# Altium PCB EB1_Spartan_III_1_02.PcbDoc (part 2 of 4)
Units mm, origin at the board's own origin, x right, y up, seen from the top; angles counter-clockwise.
Board outline 165.1 x 115.01 mm, 6 copper layers (Top Layer, MidLayer1, VCC Plane, GND Plane, MidLayer2, Bottom Layer); 356 components, 386 nets, 1788 pads, 779 vias.
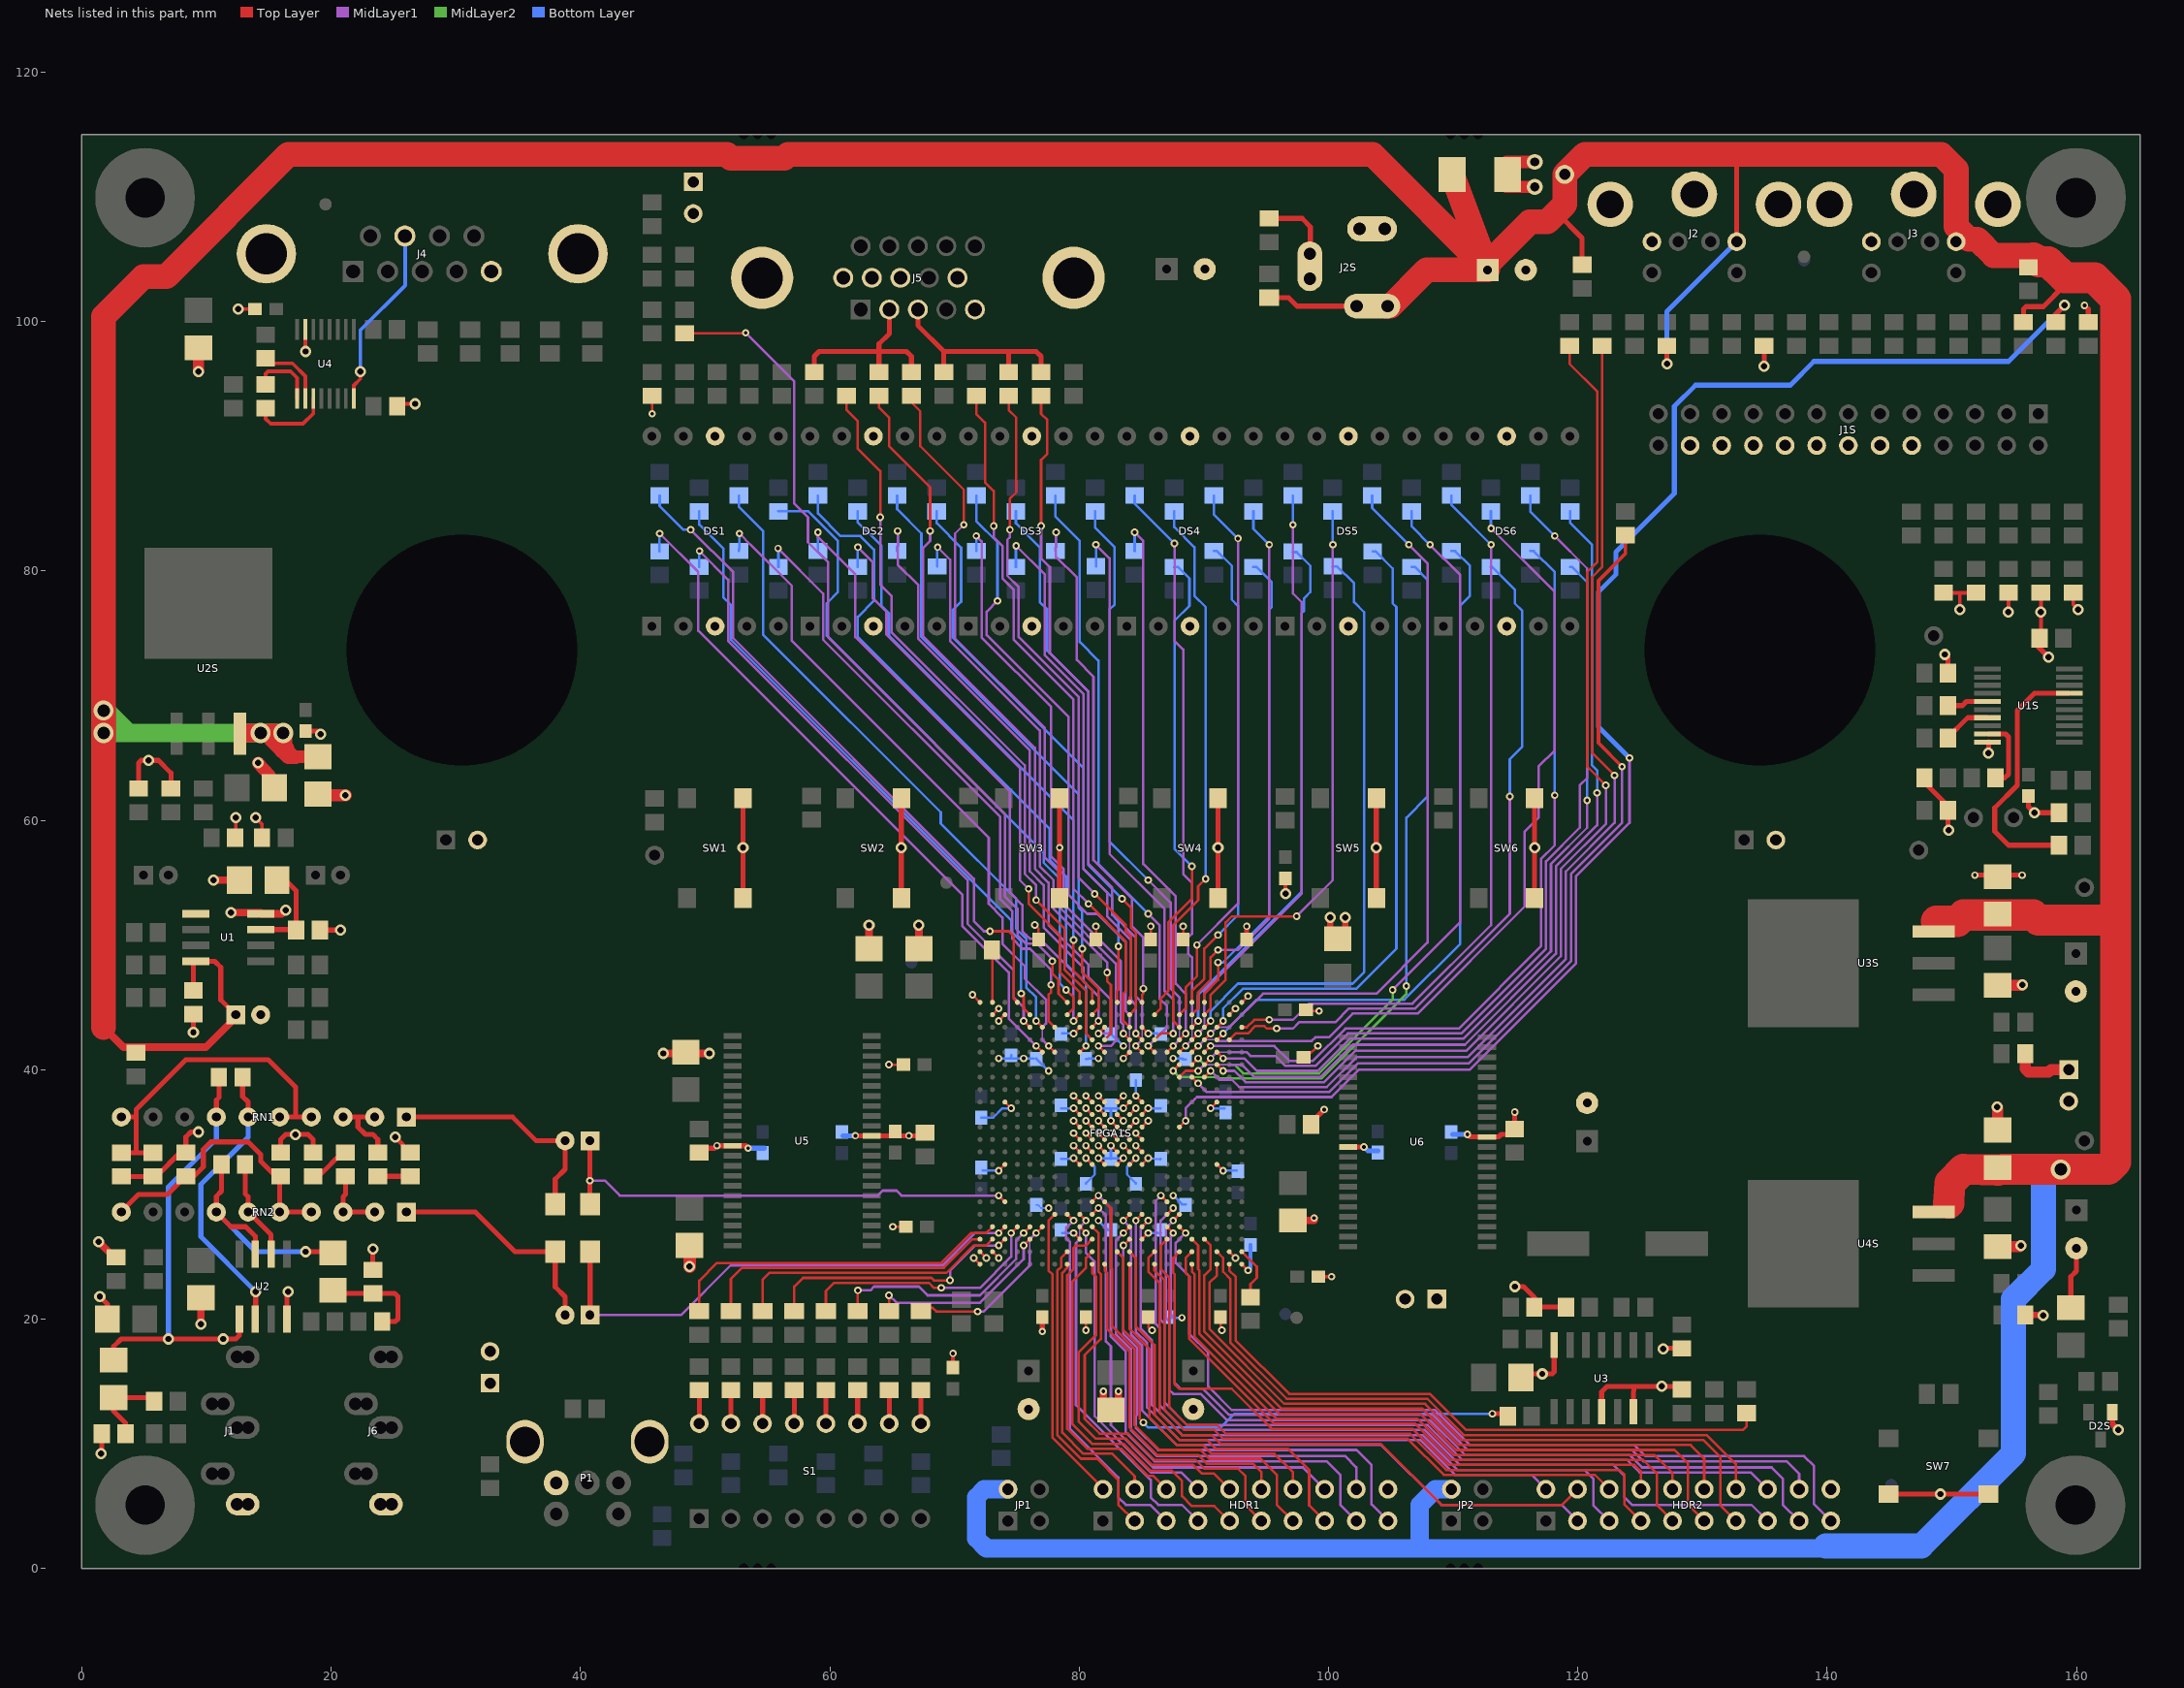
[diagram p6: the nets of this part, all layers, seen from the top]

## Via types
v1: diameter 0.6, hole 0.3, Top Layer to Bottom Layer, tented both sides, 427 vias
v2: diameter 1.6, hole 1, Top Layer to Bottom Layer, 224 vias
v3: diameter 0.9, hole 0.5, Top Layer to Bottom Layer, tented both sides, 126 vias
v4: diameter 1.27, hole 0.711, Top Layer to Bottom Layer, tented both sides, 2 vias

## Nets (pads, with @x,y where several pads share a name; then routed paths per layer and width w, separated by ;. In a path a pad name is that pad's centre, name@x,y a point inside that pad or via, vN(x,y) a via of type N, cw(c..) or ccw(c..) an arc to the next point about the centre after c; other vN are vias at no path point) (continued)
+5V: C37.1 C39.2 C70S.1 C73S.1 C75S.1 C77S.1 D1S.2 J2.5 J2S.1 J2S.1A J2S.1B J3.5 JP1.2 JP2.2 LED1.1 R6.2 R84.1 R85.1 R86.1 R87.1 TP6S.1 U1.8 U2S.3 U3S.3 U4S.3 | length 580.3
  Top Layer w0.4: C39.2@8.95,46.35 U1.8@8.95,48.6 ; U1.8@9.15,48.695 10.655,48.695 11.15,48.2 11.15,45.6 C37.1@12.35,44.4 ; LED1.1@95.25,101.92 96.8,101.92 97.485,101.235 J2S.1A@102.255,101.235 ; J2S.1@102.2,101.3 102.255,101.3 J2S.1@103.45,101.3 ; J2S.1@103.505,101.235 J2S.1@104.55,101.235 ; 118.25,108.8 118.3,108.75 120.35,106.7 R86.1@120.35,104.55 ; 122.55,113.4 122.555,113.595 125.65,113.4 ; v3(127.15,96.6) R87.1@127.15,98.05 ; 132.65,113.3 132.75,113.2 J2.5@132.75,106.4 ; R84.1@155.75,99.95 155.75,101 155.95,101.2 157.35,101.2 158.95,102.8
  Top Layer w0.6: 1.75,43.8 1.75,43.4 3.35,41.8 R6.2@4.35,41.8 ; R6.2@4.35,41.35 R6.2@4.35,41.8 ; C37.1@12.35,44.4 12.35,44.2 9.95,41.8 R6.2@4.35,41.8
  Top Layer w1: v2@14.75,66.8 15.35,66.2 16.55,65 17.15,65 ; v2@15.7,66.95 16.139,66.901 v2@16.15,66.9 ; 16.15,65.4 16.15,65.5 ; 16.15,65.7 16.15,65.5 ; v2(16.15,67) v2@16.15,66.9 ; 16.55,65.7 16.55,65.8 ; 16.95,65.2 16.15,66 v2@16.15,66.9 ; C73S.1@18.95,65.1 16.55,65.1 16.2,65.45 16.15,65.5
  Top Layer w1.5: U2S.3@12.95,67 v2(14.35,67) v2(16.15,67) 16.15,66.9 16.15,66 16.15,65.7
  Top Layer w2: 1.75,43.4 v2(1.75,67) v2(1.75,68.8) 1.75,100.4 4.95,103.6 6.784,103.6 16.55,113.4 51.75,113.4 52.05,113.1 56.35,113.1 56.65,113.4 103.55,113.4 C70S.1@112.776,104.14 ; J2S.1@104.55,101.235 J2S.1B@104.755,101.235 104.985,101.235 107.89,104.14 C70S.1@112.776,104.14 ; D1S.2@109.928,111.8 C70S.1@112.776,104.14 ; C70S.1@112.776,104.626 116.15,108 117.55,108 118.3,108.75 118.95,109.4 TP6S.1@118.95,111.8 120.55,113.4 122.55,113.4 125.65,113.4 149.15,113.4 150.35,112.2 150.35,107.6 150.95,107 151.35,106.6 152.05,106.6 153.35,105.3 156.15,105.3 156.65,105.3
  Top Layer w2.5: 148.75,51.9 150.45,51.9 150.95,52.4 153.67,52.4 156.55,52.4 156.95,52 163.15,52 ; 149.75,29.3 149.782,29.617 149.85,30.9 150.95,32 153.666,31.953 153.696,31.952 154.07,32 v2(158.75,32) 162.55,32 163.15,32.6 163.15,52 ; 156.551,105.096 156.775,104.975 156.95,104.8 157.75,104.8 159.05,103.5 161.45,103.5 163.15,101.8 163.15,52
  MidLayer2 w1.5: v2(16.15,67) v2(14.35,67) 3.75,67 ; 3.75,67 2.75,68 1.95,68.8 v2(1.75,68.8) v2(1.75,67) 3.75,67
  Bottom Layer w0.4: v3(127.15,96.6) 127.15,100.8 J2.5@132.75,106.4
  Bottom Layer w1.5: JP1.2@74.295,6.35 72.39,6.35 71.755,5.715 71.755,2.395 72.55,1.6 139.69,1.6 139.89,1.8 ; 107.315,1.905 107.315,5.08 108.585,6.35 JP2.2@109.855,6.35
  Bottom Layer w2: 139.89,1.8 147.55,1.8 154.95,9.2 154.95,21.6 157.35,24 157.35,32 ; 156.95,32 157.35,32 ; v2(158.75,32) 157.35,32
AUDIOL: C7.1 C41.1 FPGA1S.W3 | length 41.3
  Top Layer w0.2: v1(73.55,26.9) FPGA1S.W3@74.05,27.4
  Top Layer w0.4: C41.1@40.767,20.32 40.77,20.323 C7.1@40.77,25.4
  MidLayer1 w0.2: C41.1@40.767,20.32 48.07,20.32 52.05,24.3 69.05,24.3 71.65,26.9 v1(73.55,26.9)
AUDIOR: C6.1 C40.1 FPGA1S.U3 | length 39.4
  Top Layer w0.2: v1(73.55,29.9) FPGA1S.U3@74.05,29.4
  Top Layer w0.4: C40.1@40.767,34.29 40.767,31.1 40.767,29.213 C6.1@40.77,29.21
  MidLayer1 w0.2: v1(40.75,31.1) 41.95,31.1 43.15,29.9 63.85,29.9 64.25,30.3 65.35,30.3 65.75,29.9 v1(73.55,29.9)
BLUE0: FPGA1S.C13 R106.1 | length 55.9
  Top Layer w0.2: R106.1@71.75,94.05 71.75,92.6 72.45,91.9 72.45,87.1 73.15,86.4 v1(73.15,83.6) ; v1(80.75,53.3) 83.75,50.3 83.75,46.3 83.55,46.1 83.55,43.9 FPGA1S.C13@84.05,43.4
  MidLayer1 w0.2: v1(73.15,83.6) 73.15,82.7 73.85,82 73.85,79.4 74.75,78.5 74.75,74.5 79.55,69.7 79.55,54.5 v1(80.75,53.3)
BLUE1: FPGA1S.A13 R108.1 | length 53.3
  Top Layer w0.2: R108.1@74.35,94.05 74.35,92.9 74.95,92.3 74.95,86.3 74.45,85.8 v1(74.45,83.3) ; v1(81.25,54.1) 83.75,51.6 83.75,51.1 84.15,50.7 84.15,45.9 84.05,45.8 FPGA1S.A13@84.05,45.4
  MidLayer1 w0.2: v1(74.45,83.3) 74.45,82.7 74.25,82.5 74.25,79.6 75.15,78.7 75.15,74.7 79.95,69.9 79.95,55.4 v1(81.25,54.1)
BLUE2: FPGA1S.E14 R111.1 | length 56.8
  Top Layer w0.2: v1(76.95,83.6) 76.95,88.9 77.45,89.4 77.45,92.1 76.95,92.6 R111.1@76.95,94.05 ; v1(84.55,41.9) FPGA1S.E14@85.05,41.4
  MidLayer1 w0.127: 85.05,42.4 85.05,43.4
  MidLayer1 w0.2: v1(76.95,83.6) 76.95,81 77.65,80.3 77.65,73.4 80.75,70.3 80.75,56.5 82.65,54.6 82.65,52.5 84.55,50.6 84.55,45.9 85.05,45.4 85.05,43.4 ; v1(84.55,41.9) 85.05,42.4
BLUE#: J5.3 R107.2 R108.2 R111.2 | length 16.7
  Top Layer w0.4: J5.3@67.064,100.965 67.064,99.686 69.15,97.6 ; R107.2@69.15,95.95 69.15,97.6 ; R108.2@74.35,95.95 74.35,97.6 ; R111.2@76.95,96 76.95,97.2 76.55,97.6 74.35,97.6 ; 69.15,97.6 74.35,97.6
CTS: J4.7 U4.8 | length 14.8
  Top Layer w0.3: U4.8@21.825,93.825 21.825,94.875 22.35,95.4 v3(22.35,96)
  Bottom Layer w0.3: v3(22.35,96) 22.35,99.3 25.95,102.9 25.95,106.825 J4.7@25.92,106.855
DIG0_SEG0: FPGA1S.C6 R25.2 | length 52.7
  Top Layer w0.2: v1(76.55,43.9) FPGA1S.C6@77.05,43.4
  Bottom Layer w0.2: R25.2@52.705,86.045 52.705,85.145 54.65,83.2 54.65,74.9 68.906,60.644 68.906,59.744 74.95,53.7 74.95,51.3 75.75,50.5 75.75,46.6 76.55,45.8 v1(76.55,43.9)
DIG0_SEG1: FPGA1S.B8 R29.2 | length 52.5
  Top Layer w0.2: v1(78.95,46.4) 79.55,45.8 79.55,44.9 FPGA1S.B8@79.05,44.4
  Bottom Layer w0.2: R29.2@55.88,84.775 58.275,84.775 60.65,82.4 60.65,78.3 59.75,77.4 59.75,74.8 77.15,57.4 77.15,56.6 78.45,55.3 78.45,46.9 v1(78.95,46.4)
DIG0_SEG2: FPGA1S.E7 R33.2 | length 53.8
  Top Layer w0.2: v1(77.55,41.9) FPGA1S.E7@78.05,41.4
  MidLayer1 w0.127: 77.05,42.4 77.05,43.4
  MidLayer1 w0.2: v1(52.75,83) 53.643,82.093 ; 53.65,82.1 56.95,78.8 56.95,74.4 72.75,58.6 72.75,53.3 73.85,52.2 73.85,50.1 75.65,48.3 75.65,47.3 77.35,45.6 77.35,43.7 77.05,43.4 ; 77.05,42.4 v1(77.55,41.9)
  Bottom Layer w0.2: R33.2@52.705,81.595 52.705,81.755 52.75,81.8 v1(52.75,83)
DIG0_SEG3: FPGA1S.C5 R37.2 | length 50.5
  Top Layer w0.2: v1(75.55,43.9) FPGA1S.C5@76.05,43.4
  MidLayer1 w0.2: v1(49.55,81.6) 51.85,79.3 51.85,74.4 71.05,55.2 71.05,51.7 74.75,48 74.75,45.8 75.55,45 v1(75.55,43.9)
  Bottom Layer w0.2: R37.2@49.53,80.325 49.53,81.58 v1(49.55,81.6)
DIG0_SEG4: FPGA1S.E6 R41.2 | length 55.7
  Top Layer w0.2: v1(76.55,41.9) FPGA1S.E6@77.05,41.4
  MidLayer1 w0.2: v1(46.35,83) 49.45,79.9 49.45,75.2 70.65,54 70.65,51.5 74.35,47.8 74.35,44.1 v1(76.55,41.9)
  Bottom Layer w0.2: R41.2@46.35,81.57 v1(46.35,83)
DIG0_SEG5: FPGA1S.B5 R45.2 | length 51.4
  Top Layer w0.2: v1(75.35,46.1) 75.55,45.9 75.55,44.9 FPGA1S.B5@76.05,44.4
  Bottom Layer w0.2: R45.2@49.53,84.775 49.53,83.72 51.45,81.8 51.45,77.9 52.05,77.3 52.05,74.5 74.55,52 74.55,51.1 75.35,50.3 v1(75.35,46.1)
DIG0_SEG6: FPGA1S.A4 R49.2 | length 54.1
  Top Layer w0.2: v1(72.85,51.1) 74.35,51.1 74.75,50.7 74.75,45.7 FPGA1S.A4@75.05,45.4
  MidLayer1 w0.2: v1(48.85,83.3) 52.25,79.9 52.25,74.6 71.55,55.3 71.55,51.9 72.35,51.1 v1(72.85,51.1)
  Bottom Layer w0.2: R49.2@46.355,86.045 46.355,85.195 48.25,83.3 v1(48.85,83.3)
DIG0_SEG7: FPGA1S.C7 R53.2 | length 49.6
  Top Layer w0.2: v1(77.75,46.8) 77.75,46.2 77.55,46 77.55,43.9 FPGA1S.C7@78.05,43.4
  MidLayer1 w0.2: v1(55.85,81.8) 59.475,78.175 59.475,74.475 73.65,60.3 73.65,53.7 74.65,52.7 74.65,50.5 75.45,49.7 76.05,49.7 77.75,48 v1(77.75,46.8)
  Bottom Layer w0.2: v1(55.85,81.8) 55.88,81.77 R53.2@55.88,80.325
DIG1_SEG0: FPGA1S.B10 R26.2 | length 48.5
  Top Layer w0.2: v1(80.25,49.7) 80.25,47.8 81.55,46.5 81.55,44.9 FPGA1S.B10@81.05,44.4
  Bottom Layer w0.2: R26.2@65.405,86.045 65.405,84.945 67.35,83 67.35,74.7 79.95,62.1 79.95,53 80.25,52.7 v1(80.25,49.7)
DIG1_SEG1: FPGA1S.A12 R30.2 | length 46
  Top Layer w0.2: FPGA1S.A12@83.05,45.4 83.05,46.3 83.15,46.4 v1(83.15,49.9)
  Bottom Layer w0.2: R30.2@68.58,84.775 68.58,83.82 70.536,81.864 70.536,77.521 69.85,76.835 69.85,74.7 80.35,64.2 80.35,56.1 82.65,53.8 82.65,52.4 83.15,51.9 v1(83.15,49.9)
DIG1_SEG2: FPGA1S.C10 R34.2 | length 48.3
  Top Layer w0.2: FPGA1S.C10@81.05,43.4 v1(81.55,43.9)
  MidLayer1 w0.2: v1(65.45,83.2) 65.45,80.5 67.101,78.849 67.101,74.549 76.05,65.6 76.05,55.9 77.15,54.8 77.15,51.4 80.35,48.2 80.35,47.1 81.55,45.9 v1(81.55,43.9)
  Bottom Layer w0.2: R34.2@65.405,81.595 65.405,81.955 65.45,82 v1(65.45,83.2)
DIG1_SEG3: FPGA1S.A9 R38.2 | length 45.5
  Top Layer w0.2: v1(75.95,54.5) 75.95,53.3 78.45,50.8 78.45,47.8 80.05,46.2 FPGA1S.A9@80.05,45.4
  MidLayer1 w0.2: v1(62.25,81.9) 63.45,80.7 63.45,77.8 64.55,76.7 64.55,74.9 75.25,64.2 75.25,55.2 v1(75.95,54.5)
  Bottom Layer w0.2: R38.2@62.23,80.325 62.23,80.48 62.25,80.5 v1(62.25,81.9)
DIG1_SEG4: FPGA1S.B9 R42.2 | length 50.4
  Top Layer w0.2: v1(79.55,43.9) FPGA1S.B9@80.05,44.4
  MidLayer1 w0.2: v1(59.05,83.1) 59.05,82.7 62.05,79.7 62.05,74.7 74.45,62.3 74.45,54.2 75.45,53.2 75.45,51.1 75.761,50.789 76.05,50.5 76.85,50.5 79.55,47.8 v1(79.55,43.9)
  Bottom Layer w0.2: v1(59.05,83.1) 59.055,83.095 R42.2@59.055,81.595
DIG1_SEG5: FPGA1S.A10 R46.2 | length 47.2
  Top Layer w0.2: v1(79.55,50.4) 79.55,47.9 81.05,46.4 FPGA1S.A10@81.05,45.4
  Bottom Layer w0.2: R46.2@62.23,84.775 62.23,83.92 64.15,82 64.15,77.2 64.75,76.6 64.75,74.8 79.55,60 v1(79.55,50.4)
DIG1_SEG6: FPGA1S.E9 R50.2 | length 55.8
  Top Layer w0.2: FPGA1S.E9@80.05,41.4 v1(80.55,41.9)
  Bottom Layer w0.2: R50.2@59.055,86.045 59.055,84.595 60.85,82.8 62.45,82.8 63.55,81.7 63.55,77.6 62.25,76.3 62.25,74.7 77.65,59.3 77.65,56.8 78.95,55.5 78.95,48.5 80.55,46.9 v1(80.55,41.9)
DIG1_SEG7: FPGA1S.D11 R54.2 | length 47
  Top Layer w0.2: FPGA1S.D11@82.05,42.4 82.55,42.9 82.55,46.8 82.25,47.1 v1(82.25,47.8)
  MidLayer1 w0.2: v1(68.65,81.9) 69.65,80.9 69.65,74.4 76.85,67.2 76.85,56.3 77.95,55.2 77.95,52.9 82.25,48.6 v1(82.25,47.8)
  Bottom Layer w0.2: R54.2@68.623,80.347 68.623,81.873 v1(68.65,81.9)
DIG2_SEG0: FPGA1S.E15 R27.2 | length 49.2
  Top Layer w0.2: v1(85.55,41.9) FPGA1S.E15@86.05,41.4
  MidLayer1 w0.127: 87.05,43.4 87.05,44.4
  MidLayer1 w0.2: v1(85.55,41.9) 87.05,43.4 ; v1(85.55,52.5) 86.45,51.6 86.45,45.7 87.05,45.1 87.05,44.4
  Bottom Layer w0.2: R27.2@78.105,86.045 78.105,84.345 80.05,82.4 80.05,74.3 81.55,72.8 81.55,56.5 v1(85.55,52.5)
DIG2_SEG1: FPGA1S.E16 R31.2 | length 46.9
  Top Layer w0.2: FPGA1S.E16@87.05,41.4 v1(87.55,41.9)
  MidLayer1 w0.127: 88.05,42.4 88.05,43.4
  MidLayer1 w0.2: v1(85.55,55.2) 87.35,53.4 87.35,46.5 88.05,45.8 88.05,43.4 ; v1(87.55,41.9) 88.05,42.4
  Bottom Layer w0.2: R31.2@81.28,84.775 81.28,83.47 82.85,81.9 82.85,77.3 82.45,76.9 82.45,58.3 v1(85.55,55.2)
DIG2_SEG2: FPGA1S.A14 R35.2 | length 42.2
  Top Layer w0.2: FPGA1S.A14@85.05,45.4 85.05,46 85.15,46.1 v1(85.15,46.5)
  MidLayer1 w0.2: v1(78.15,83.1) 78.15,81.1 79.814,79.466 79.814,72.866 81.15,71.5 81.15,56.8 84.25,53.7 84.25,51.5 85.15,50.6 v1(85.15,46.5)
  Bottom Layer w0.2: R35.2@78.105,81.595 78.105,81.855 78.15,81.9 v1(78.15,83.1)
DIG2_SEG3: FPGA1S.D14 R39.2 | length 45.5
  Top Layer w0.2: v1(84.55,42.9) FPGA1S.D14@85.05,42.4
  MidLayer1 w0.2: v1(74.95,82) 77.25,79.7 77.25,73.234 80.35,70.134 80.35,56.1 82.25,54.2 82.25,52.3 84.15,50.4 84.15,45.6 84.55,45.2 v1(84.55,42.9)
  Bottom Layer w0.2: R39.2@74.93,80.325 74.93,81.98 v1(74.95,82)
DIG2_SEG4: FPGA1S.D13 R43.2 | length 46.7
  Top Layer w0.2: v1(83.55,42.9) FPGA1S.D13@84.05,42.4
  MidLayer1 w0.2: v1(71.75,82.8) 72.187,82.363 72.187,74.651 77.75,69.1 77.75,57.1 78.75,56.1 78.75,53.3 83.35,48.7 83.35,43.8 83.55,43.6 v1(83.55,42.9)
  Bottom Layer w0.2: v1(71.75,82.8) 71.755,82.795 R43.2@71.755,81.595
DIG2_SEG5: FPGA1S.B13 R47.2 | length 44.6
  Top Layer w0.2: v1(83.45,53.7) 84.15,53 84.15,51.4 84.55,51 84.55,44.9 FPGA1S.B13@84.05,44.4
  Bottom Layer w0.2: R47.2@74.93,84.775 74.93,83.82 76.85,81.9 76.85,77.5 77.45,76.9 77.45,73.6 80.75,70.3 80.75,56.4 v1(83.45,53.7)
DIG2_SEG6: FPGA1S.E13 R51.2 | length 52.3
  Top Layer w0.2: v1(83.55,40.9) FPGA1S.E13@84.05,41.4
  MidLayer1 w0.127: 84.05,41.4 84.05,43.4
  MidLayer1 w0.2: v1(73.45,77.6) 72.593,76.733 72.593,74.854 79.15,68.3 79.15,54 80.65,52.5 81.45,52.5 83.75,50.2 83.75,44.7 84.05,44.4 84.05,43.4 ; v1(83.55,40.9) 84.05,41.4
  Bottom Layer w0.2: R51.2@71.755,86.045 71.755,83.995 73.45,82.3 v1(73.45,77.6)
DIG2_SEG7: FPGA1S.D15 R55.2 | length 45.2
  Top Layer w0.2: FPGA1S.D15@86.05,42.4 86.55,42.9 v1(87.55,42.9)
  MidLayer1 w0.2: v1(81.35,82.1) 82.45,81 82.45,57.3 86.85,52.9 86.85,46.3 87.55,45.6 v1(87.55,42.9)
  Bottom Layer w0.2: R55.2@81.35,80.37 v1(81.35,82.1)
DIG3_SEG0: FPGA1S.B17 R28.2 | length 44.4
  Top Layer w0.2: FPGA1S.B17@88.05,44.4 88.55,44.9 88.55,46.6 89.45,47.5 v1(89.45,50)
  MidLayer1 w0.2: v1(89.45,50) 92.75,53.3 v1(92.75,82.6)
  Bottom Layer w0.2: R28.2@90.805,86.045 90.805,84.545 v1(92.75,82.6)
DIG3_SEG1: FPGA1S.B18 R32.2 | length 44.4
  Top Layer w0.2: FPGA1S.B18@89.05,44.4 89.55,44.9 89.55,46.2 90.55,47.2 90.55,49 v1(91.15,49.6)
  MidLayer1 w0.2: v1(91.15,49.6) 92.75,49.6 95.25,52.1 v1(95.25,82.1)
  Bottom Layer w0.2: R32.2@93.98,84.775 93.98,83.37 v1(95.25,82.1)
DIG3_SEG2: FPGA1S.A18 R36.2 | length 38.7
  Top Layer w0.2: FPGA1S.A18@89.05,45.4 89.05,46.3 90.05,47.3 90.05,49.7 v1(91.15,50.8)
  Bottom Layer w0.2: R36.2@90.805,81.595 91.055,81.595 92.25,80.4 92.25,77.7 92.75,77.2 92.75,52.4 v1(91.15,50.8)
DIG3_SEG3: FPGA1S.B15 R40.2 | length 38.9
  Top Layer w0.2: FPGA1S.B15@86.05,44.4 86.55,44.9 86.55,45.7 87.15,46.3 87.15,51.8 89.05,53.7 v1(89.05,56.3)
  Bottom Layer w0.2: R40.2@87.63,80.325 87.925,80.325 88.85,79.4 88.85,77.2 87.65,76 87.65,57.7 v1(89.05,56.3)
DIG3_SEG4: FPGA1S.D17 R44.2 | length 44.1
  Top Layer w0.2: FPGA1S.D17@88.05,42.4 v1(88.55,42.9)
  MidLayer1 w0.2: v1(84.45,83.1) 85.15,82.4 85.15,56.5 87.75,53.9 87.75,46.9 88.55,46.1 v1(88.55,42.9)
  Bottom Layer w0.2: v1(84.45,83.1) 84.455,83.095 R44.2@84.455,81.595
DIG3_SEG5: FPGA1S.C17 R48.2 | length 43.7
  Top Layer w0.2: FPGA1S.C17@88.05,43.4 87.55,43.9 87.55,51.6 89.55,53.6 89.55,54.7 v1(90.15,55.3)
  Bottom Layer w0.2: R48.2@87.63,84.775 87.63,83.52 89.25,81.9 89.25,78 90.15,77.1 v1(90.15,55.3)
DIG3_SEG6: FPGA1S.E17 R52.2 | length 47.2
  Top Layer w0.2: FPGA1S.E17@88.05,41.4 v1(88.55,41.9)
  MidLayer1 w0.127: 89.05,42.4 89.05,44.4
  MidLayer1 w0.2: v1(87.65,82.2) 87.65,74.4 88.35,73.7 88.35,55.7 89.05,55 89.05,50.9 88.75,50.6 88.75,49.3 89.05,49 89.05,44.4 ; v1(88.55,41.9) 89.05,42.4
  Bottom Layer w0.2: R52.2@84.455,86.045 84.455,85.395 v1(87.65,82.2)
DIG3_SEG7: FPGA1S.A19 R56.2 | length 38.1
  Top Layer w0.2: FPGA1S.A19@90.05,45.4 90.05,46.1 91.15,47.2 v1(91.15,48.6)
  Bottom Layer w0.2: v1(91.15,48.6) 91.55,48.6 95.25,52.3 95.25,76.9 95.45,77.1 95.45,79.1 94.225,80.325 R56.2@93.98,80.325
DIG4_SEG0: FPGA1S.D19 R57.2 | length 58.8
  Top Layer w0.2: FPGA1S.D19@90.05,42.4 v1(90.55,42.9)
  MidLayer1 w0.127: 91.05,43.4 92.05,43.4
  MidLayer1 w0.2: v1(90.55,42.9) 91.05,43.4 ; 92.05,43.4 94.75,46.1 103.85,46.1 107.95,50.2 107.95,80.6 v1(106.45,82.1)
  Bottom Layer w0.2: R57.2@103.505,86.045 103.505,85.045 v1(106.45,82.1)
DIG4_SEG1: FPGA1S.F18 R59.2 | length 62.3
  Top Layer w0.2: FPGA1S.F18@89.05,40.4 v1(89.55,40.9)
  MidLayer1 w0.2: v1(105.15,46.4) 110.55,51.8 110.55,79.7 v1(108.15,82.1)
  MidLayer2 w0.127: 90.023,40.427 90.05,40.4 92.05,40.4
  MidLayer2 w0.2: v1(89.55,40.9) 90.05,40.4 ; 92.05,40.4 92.45,40.4 93.15,39.7 99.25,39.7 105.15,45.6 v1(105.15,46.4)
  Bottom Layer w0.2: R59.2@106.68,84.775 106.68,83.57 v1(108.15,82.1)
DIG4_SEG2: FPGA1S.C20 R61.2 | length 50.4
  Top Layer w0.2: FPGA1S.C20@91.05,43.4 v1(91.55,43.9)
  Bottom Layer w0.2: v1(91.55,43.9) 91.55,44.9 93.15,46.5 102.25,46.5 105.45,49.7 105.45,77.1 105.15,77.4 105.15,80.2 103.78,81.57 R61.2@103.55,81.57
DIG4_SEG3: FPGA1S.C19 R63.2 | length 48.9
  Top Layer w0.2: FPGA1S.C19@90.05,43.4 v1(90.55,43.9)
  Bottom Layer w0.2: v1(90.55,43.9) 90.55,44.7 92.75,46.9 101.95,46.9 102.85,47.8 102.85,76.7 102.05,77.5 102.05,79 100.68,80.37 R63.2@100.35,80.37
DIG4_SEG4: FPGA1S.C18 R65.2 | length 42.8
  Top Layer w0.2: FPGA1S.C18@89.05,43.4 v1(89.55,43.9)
  Bottom Layer w0.2: v1(89.55,43.9) 89.55,46 97.85,54.3 97.85,76.6 98.05,76.8 98.05,77.8 98.55,78.3 98.55,80.4 97.45,81.5 R65.2@97.15,81.5
DIG4_SEG5: FPGA1S.B19 R67.2 | length 47.7
  Top Layer w0.2: FPGA1S.B19@90.05,44.4 90.55,44.9 90.55,46 91.75,47.2 91.75,51.8 92.25,52.3 v1(97.45,52.3)
  MidLayer1 w0.2: v1(97.45,52.3) 100.35,55.2 v1(100.35,82.1)
  Bottom Layer w0.2: R67.2@100.33,84.775 100.33,84.22 100.35,84.2 v1(100.35,82.1)
DIG4_SEG6: FPGA1S.D18 R69.2 | length 47.6
  Top Layer w0.2: FPGA1S.D18@89.05,42.4 v1(89.55,42.9)
  MidLayer1 w0.127: 90.05,43.4 90.05,44.4
  MidLayer1 w0.2: v1(89.55,42.9) 90.05,43.4 ; 90.05,44.4 90.05,46.3 97.85,54.1 97.85,77.5 97.15,78.2 v1(97.15,83.7)
  Bottom Layer w0.2: v1(97.15,83.7) 97.15,85.6 97.155,85.605 R69.2@97.155,86.045
DIG4_SEG7: FPGA1S.F17 R71.2 | length 58.1
  Top Layer w0.2: v1(87.55,39.9) FPGA1S.F17@88.05,40.4
  MidLayer2 w0.127: 89.05,39.4 91.15,39.4
  MidLayer2 w0.2: v1(87.55,39.9) 88.05,39.4 89.05,39.4 ; 91.15,39.4 91.25,39.3 99.45,39.3 106.25,46.1 v1(106.25,46.7)
  Bottom Layer w0.2: v1(106.25,46.7) 106.25,60.2 107.95,61.9 107.95,79.3 106.925,80.325 R71.2@106.68,80.325
DIG5_SEG0: FPGA1S.F19 R58.2 | length 71.8
  Top Layer w0.2: FPGA1S.F19@90.05,40.4 v1(90.55,40.9)
  MidLayer1 w0.127: 91.05,41.4 92.05,41.4
  MidLayer1 w0.2: v1(90.55,40.9) 91.05,41.4 ; 92.05,41.4 93.45,41.4 93.75,41.1 95.75,41.1 96.55,40.3 98.95,40.3 101.55,42.9 110.65,42.9 117.45,49.7 117.45,56.7 120.15,59.4 120.15,62.8 120.75,63.4 120.75,80.2 v1(118.15,82.8)
  Bottom Layer w0.2: R58.2@116.205,86.045 116.205,84.745 v1(118.15,82.8)
DIG5_SEG1: FPGA1S.G17 R60.2 | length 72.9
  Top Layer w0.2: FPGA1S.G17@88.05,39.4 88.55,39.9 v1(89.55,39.9)
  MidLayer1 w0.127: 90.05,40.4 92.05,40.4
  MidLayer1 w0.2: v1(89.55,39.9) 90.05,40.4 ; 92.05,40.4 93.05,40.4 94.05,39.4 99.35,39.4 101.95,42 110.95,42 118.25,49.3 118.25,56.3 121.55,59.6 v1(121.55,62.2)
  Bottom Layer w0.2: R60.2@119.38,84.775 119.38,83.87 121.15,82.1 121.15,64.4 121.55,64 v1(121.55,62.2)
DIG5_SEG2: FPGA1S.E19 R62.2 | length 64.6
  Top Layer w0.2: FPGA1S.E19@90.05,41.4 v1(90.55,41.9)
  MidLayer1 w0.2: v1(90.55,41.9) 95.65,41.9 96.85,40.7 98.75,40.7 101.35,43.3 110.45,43.3 117.05,49.9 117.05,56.9 118.15,58 v1(118.15,62)
  Bottom Layer w0.2: R62.2@116.205,81.595 116.455,81.595 118.15,79.9 v1(118.15,62)
DIG5_SEG3: FPGA1S.D21 R64.2 | length 56.2
  Top Layer w0.2: FPGA1S.D21@92.05,42.4 92.55,42.9 93.55,42.9 94.15,43.5 94.85,43.5 95.05,43.3 v1(95.85,43.3)
  MidLayer1 w0.2: v1(95.85,43.3) 97.15,43.3 97.65,43.8 100.55,43.8 101.65,44.9 106.95,44.9 114.55,52.5 v1(114.55,61.9)
  Bottom Layer w0.2: R64.2@113.03,80.325 113.125,80.325 114.95,78.5 114.95,77.4 115.55,76.8 115.55,65.9 114.55,64.9 v1(114.55,61.9)
DIG5_SEG4: FPGA1S.D20 R66.2 | length 55.3
  Top Layer w0.2: FPGA1S.D20@91.05,42.4 v1(91.55,42.9)
  Bottom Layer w0.2: v1(91.55,42.9) 94.25,45.6 106.084,45.6 110.55,50.066 110.55,77.2 111.35,78 111.35,80.4 110.155,81.595 R66.2@109.855,81.595
DIG5_SEG5: FPGA1S.E18 R68.2 | length 66.4
  Top Layer w0.2: FPGA1S.E18@89.05,41.4 v1(89.55,41.9)
  MidLayer1 w0.127: 90.05,42.4 91.05,42.4
  MidLayer1 w0.2: v1(89.55,41.9) 90.05,42.4 ; 91.05,42.4 91.15,42.3 98.65,42.3 98.95,42.6 100.05,42.6 101.95,44.5 107.15,44.5 115.75,53.1 115.75,59.1 116.85,60.2 116.85,64.3 118.15,65.6 118.15,78.3 v1(113.05,83.4)
  Bottom Layer w0.2: R68.2@113.03,84.775 113.03,83.42 v1(113.05,83.4)
DIG5_SEG6: FPGA1S.C22 R70.2 | length 59.2
  Top Layer w0.2: FPGA1S.C22@93.05,43.4 93.45,43.4 94.05,44 v1(95.25,44)
  MidLayer1 w0.2: v1(95.25,44) 97.15,44 98.45,45.3 106.75,45.3 113.05,51.6 v1(113.05,82.1)
  Bottom Layer w0.2: R70.2@109.855,86.045 109.855,85.295 v1(113.05,82.1)
DIG5_SEG7: FPGA1S.E20 R72.2 | length 64.1
  Top Layer w0.2: FPGA1S.E20@91.05,41.4 v1(91.55,40.9)
  MidLayer1 w0.2: v1(91.55,40.9) 93.25,40.9 94.25,39.9 99.15,39.9 101.75,42.5 110.85,42.5 117.85,49.5 117.85,56.5 120.75,59.4 v1(120.75,61.6)
  Bottom Layer w0.2: R72.2@119.38,80.325 119.525,80.325 120.75,79.1 v1(120.75,61.6)
FCLK: FPGA1S.AA12 R122.1 | length 44.4
  Top Layer w0.2: FPGA1S.AA12@83.05,25.4 83.55,24.9 83.55,19.1 84.85,17.8 84.85,12.034 85.15,11.734 v1(85.15,11.7)
  Top Layer w0.4: v1(113.15,12.4) R122.1@114.4,12.4
  Bottom Layer w0.2: v1(85.15,11.7) 85.55,11.3 91.35,11.3 92.45,12.4 v1(113.15,12.4)
FPGA_CCLK: FPGA1S.AA22 R1S.2 | length 4.4
  Top Layer w0.2: FPGA1S.AA22@93.05,25.4 94.25,24.2 94.25,23.3 93.75,22.8 R1S.2@93.75,21.75
FPGA_PROGRAM: FPGA1S.A2 R2S.2 | length 4
  Top Layer w0.2: FPGA1S.A2@73.05,45.4 R2S.2@73.05,49.4
GND: C1S.2 C2S.2 C3.2 C3S.2 C4.2 C4S.2 C5.2 C5S.2 C6S.2 C7S.2 C8S.2 C9.1 C9S.2 C10S.2 C11.1 C11S.2 C12S.2 C13S.2 C14.1 C14S.2 C15.1 C15S.2 C16.1 C16S.2 C17.1 C17S.2 C18.2 C18S.2 C19.2 C19S.2 C20S.2 C21S.2 C22S.2 C23.2 C23S.2 C24.2 C24S.2 C25.1 C25S.2 C26.1 C26S.2 C27.1 C27S.2 C28.1 C28S.2 C29.1 C29S.2 C30.1 C30S.2 C31.2 C31S.2 C32.1 C32S.2 C33S.2 C34.1 C34S.2 C35S.2 C36S.2 C37.2 C37S.2 C38S.2 C39.1 C39S.2 C40S.2 C41S.2 C42S.2 C43S.2 C44S.2 C45S.2 C46S.2 C47S.2 C48S.2 C49S.2 C50S.2 C51S.2 C52S.2 C53S.2 C54S.2 C55S.2 C56S.2 C57S.2 C58S.2 C59S.2 C60S.2 C61S.2 C62S.2 C63S.2 C64S.2 C65S.2 C66S.2 C67S.2 C68S.2 C69S.2 C70S.2 C71S.2 C72S.2 C73S.2 C74S.2 C75S.2 C76S.2 C77S.2 C78S.2 C79S.1 C80S.2 D1S.1 D2S.1 DS1.3 DS1.8 DS2.3 DS2.8 DS3.3 DS3.8 DS4.3 DS4.8 DS5.3 DS5.8 DS6.3 DS6.8 FPGA1S.A1 FPGA1S.A22 FPGA1S.AA1 FPGA1S.AA2 FPGA1S.AA21 FPGA1S.AB1 FPGA1S.AB22 FPGA1S.B2 FPGA1S.B3 FPGA1S.B21 FPGA1S.C9 FPGA1S.C14 FPGA1S.J3 FPGA1S.J9 FPGA1S.J10 FPGA1S.J11 FPGA1S.J12 FPGA1S.J13 FPGA1S.J14 FPGA1S.J20 FPGA1S.K9 FPGA1S.K10 FPGA1S.K11 FPGA1S.K12 FPGA1S.K13 FPGA1S.K14 FPGA1S.L9 FPGA1S.L10 FPGA1S.L11 FPGA1S.L12 FPGA1S.L13 FPGA1S.L14 FPGA1S.M9 FPGA1S.M10 FPGA1S.M11 FPGA1S.M12 FPGA1S.M13 FPGA1S.M14 FPGA1S.N9 FPGA1S.N10 FPGA1S.N11 FPGA1S.N12 FPGA1S.N13 FPGA1S.N14 FPGA1S.P3 FPGA1S.P9 FPGA1S.P10 FPGA1S.P11 FPGA1S.P12 FPGA1S.P13 FPGA1S.P14 FPGA1S.P20 FPGA1S.Y9 FPGA1S.Y14 GJ1S.1 GJ1S.2 GJ2S.1 GJ2S.2 GJ3S.1 GJ3S.2 GJ4S.1 GJ4S.2 HDR1.20 HDR2.20 J1.1 J1.1A J1.1B J1S.18 J1S.19 J1S.20 J1S.21 J1S.22 J1S.23 J1S.24 J1S.25 J2.3 J2.MH1 J2.MH2 J2.MH3 J2S.2 J2S.2A J2S.2B J2S.3 J2S.3A J2S.3B J3.3 J3.MH1 J3.MH2 J3.MH3 J4.5 J4.10 J4.11 J5.5 J5.6 J5.7 J5.8 J5.10 J5.16 J5.17 J6.1 J6.1A J6.1B LS1.2 LS2.2 P1.3 P1.6 P1.7 R4.2 R5.2 R5S.1 R6S.1 R7S.1 R8.2 R8S.1 R31S.1 R34S.1 R35S.1 R36S.1 R74.1 R75.1 R76.1 R77.1 R78.1 R79.1 R80.1 R81.1 R83.1 R120.1 R121.1 S1.9 S1.10 S1.11 S1.12 S1.13 S1.14 S1.15 S1.16 SW1.3 SW1.4 SW2.3 SW2.4 SW3.3 SW3.4 SW4.3 SW4.4 SW5.3 SW5.4 SW6.3 SW6.4 SW7.3 SW7.4 U1.4 U1.5 U1S.10 U2.4 U3.7 U3.11 U3.13 U4.15 U5.12 U5.34 U6.12 U6.34 | length 356.8
  Top Layer w0.2: v1(45.75,92.6) C24.2@45.75,94.05 ; v1(64.75,40.4) C10S.2@65.9,40.4 ; v1@64.85,27.4 v1(65.05,27.4) C35S.2@65.9,27.4 ; v1(71.45,46) FPGA1S.A1@72.05,45.4 ; v1(71.55,24.9) FPGA1S.AB1@72.05,24.4 ; FPGA1S.AA1@72.05,25.4 v1(72.55,24.9) ; FPGA1S.AA2@73.05,25.4 v1(73.55,24.9) ; FPGA1S.B2@73.05,44.4 v1(73.55,44.9) ; v1(73.55,31.9) FPGA1S.P3@74.05,32.4 ; v1(73.55,43.9) FPGA1S.B3@74.05,44.4 ; FPGA1S.J3@74.05,37.4 v1(74.55,36.9) ; v1(76.45,51.6) 76.75,51.3 C40S.2@76.75,50.45 ; v1(79.55,26.9) FPGA1S.Y9@80.05,26.4 ; v1(79.55,32.9) FPGA1S.P9@80.05,32.4 ; v1(79.55,33.9) FPGA1S.N9@80.05,33.4 ; v1(79.55,34.9) FPGA1S.M9@80.05,34.4 ; v1(79.55,35.9) FPGA1S.L9@80.05,35.4 ; v1(79.55,36.9) FPGA1S.K9@80.05,36.4 ; v1(79.55,37.9) FPGA1S.J9@80.05,37.4 ; v1(79.55,42.9) FPGA1S.C9@80.05,43.4 ; v1(80.55,19.1) C7S.2@80.55,20.15 ; v1(80.55,32.9) FPGA1S.P10@81.05,32.4 ; v1(80.55,33.9) FPGA1S.N10@81.05,33.4 ; v1(80.55,34.9) FPGA1S.M10@81.05,34.4 ; v1(80.55,35.9) FPGA1S.L10@81.05,35.4 ; v1(80.55,36.9) FPGA1S.K10@81.05,36.4 ; v1(80.55,37.9) FPGA1S.J10@81.05,37.4 ; C16S.2@81.35,50.45 v1(81.35,51.5) ; v1(81.55,32.9) FPGA1S.P11@82.05,32.4 ; v1(81.55,33.9) FPGA1S.N11@82.05,33.4 ; v1(81.55,34.9) FPGA1S.M11@82.05,34.4 ; v1(81.55,35.9) FPGA1S.L11@82.05,35.4 ; v1(81.55,36.9) FPGA1S.K11@82.05,36.4 ; v1(81.55,37.9) FPGA1S.J11@82.05,37.4 ; v1(82.55,33.9) FPGA1S.N12@83.05,33.4 ; v1(82.55,34.9) FPGA1S.M12@83.05,34.4 ; v1(82.55,35.9) FPGA1S.L12@83.05,35.4 ; FPGA1S.P12@83.05,32.4 v1(83.55,32.9) ; FPGA1S.K12@83.05,36.4 v1(83.55,35.9) ; FPGA1S.J12@83.05,37.4 v1(83.55,37.9) ; v1(83.55,33.9) FPGA1S.N13@84.05,33.4 ; v1(83.55,34.9) FPGA1S.M13@84.05,34.4 ; v1(83.55,36.9) FPGA1S.J13@84.05,37.4 ; FPGA1S.P13@84.05,32.4 v1(84.55,32.9) ; FPGA1S.L13@84.05,35.4 v1(84.55,35.9) ; FPGA1S.K13@84.05,36.4 v1(84.55,36.9) ; v1(84.55,33.9) FPGA1S.N14@85.05,33.4 ; v1(84.55,34.9) FPGA1S.M14@85.05,34.4 ; v1(84.55,37.9) FPGA1S.J14@85.05,37.4 ; FPGA1S.Y14@85.05,26.4 v1(85.55,26.9) ; FPGA1S.P14@85.05,32.4 v1(85.55,32.9) ; FPGA1S.L14@85.05,35.4 v1(85.55,35.9) ; FPGA1S.K14@85.05,36.4 v1(85.55,36.9) ; FPGA1S.C14@85.05,43.4 v1(85.55,42.9) ; C29S.2@85.55,20.15 85.55,19.3 v1(85.85,19.1) ; C24S.2@85.75,50.45 v1(85.75,51.5) ; C39S.2@88.35,50.45 v1(88.35,51.5) ; v1(90.55,36.9) FPGA1S.J20@91.05,37.4 ; FPGA1S.P20@91.05,32.4 v1(91.55,31.9) ; C2S.2@91.35,20.15 91.35,19.1 v1(91.45,19.1) ; FPGA1S.AA21@92.05,25.4 v1(92.55,24.9) ; FPGA1S.B21@92.05,44.4 v1(92.55,44.9) ; FPGA1S.AB22@93.05,24.4 v1(93.55,23.9) ; FPGA1S.A22@93.05,45.4 v1(93.55,45.9) ; C38S.2@98.1,41.1 98.35,41.1 v1(99.15,41.9) ; C1S.2@98.25,44.7 v1(99.25,44.7)
  Top Layer w0.3: R121.1@12.35,58.6 v3(12.35,60.2) ; v3(12.55,101) C26S.2@13.9,101 ; v3(13.95,60.2) 14.45,59.7 R120.1@14.45,58.7 ; U4.15@17.925,99.375 17.925,97.625 v3(17.95,97.6) ; C23.2@25.15,93.4 25.3,93.4 v3(26.75,93.4) ; C13S.2@69.885,16.095 v1(69.885,17.245) ; v3(96.55,54.1) C25S.2@96.55,55.35 C25S.2@96.55,55.4 ; C8S.2@99.15,23.4 C8S.2@99.2,23.4 v1(100.25,23.4) ; C67S.2@149.35,78.25 150.65,78.25 ; v3(150.65,76.9) 150.65,78.25 ; C66S.2@151.95,78.25 150.65,78.25 ; v3(154.55,76.7) C61S.2@154.55,78.25 ; C68S.2@157.15,74.8 v3(157.15,76.7) C64S.2@157.15,78.25 ; C63S.2@159.75,78.25 159.75,77.3 v3(160.15,76.9)
  Top Layer w0.4: v3(1.45,21.8) 2.05,21.2 C4.2@2.05,20 C4.2@2.05,19.9 ; v3(1.55,9.2) 1.6,9.25 R4.2@1.6,10.8 ; C9.1@3.175,31.435 C14.1@5.715,31.435 5.985,31.435 C11.1@7.95,33.4 ; R35S.1@4.55,63.15 4.55,64.6 4.75,64.8 v3(5.35,64.8) 6.15,64.8 7.15,63.8 R36S.1@7.15,63.15 ; C11.1@8.35,33.35 8.35,34.6 8.75,35 v3(9.35,35) ; v3(8.95,43) C39.1@8.95,44.45 ; C15.1@15.95,33.35 15.95,34.4 16.35,34.8 v3(17.15,34.8) 18.15,34.8 18.55,34.4 C17.1@18.55,33.35 ; U2.4@16.455,20 16.455,22.105 v3(16.55,22.2) ; C3S.2@17.95,67.15 18.9,67.15 v3(19.15,66.9) ; C34.1@19.1,51.2 v3(20.75,51.2) ; R5.2@23.35,23.95 v3(23.35,25.6) ; v3(25.15,34.6) C16.1@26.35,33.35 C16.1@26.35,33.2 ; C26.1@49.35,33.7 49.53,33.7 50.75,33.7 v1(50.95,33.9) 50.96,33.89 U5.12@52.21,33.89 53.26,33.89 v1(53.45,33.7) ; S1.16@49.53,11.62 R74.1@49.53,14.29 ; S1.15@52.07,11.62 R75.1@52.07,14.29 ; SW1.3@53.04,53.775 v3(53.04,57.8) SW1.4@53.04,61.785 ; S1.14@54.61,11.62 R76.1@54.61,14.29 ; S1.13@57.15,11.62 R77.1@57.15,14.2 ; S1.12@59.69,11.62 R78.1@59.69,14.29 ; v1(62.05,34.7) 62.06,34.69 U5.34@63.36,34.69 65.25,34.69 65.35,34.69 v1(66.35,34.7) 67.647,34.691 67.648,34.691 C28.1@67.75,34.69 ; S1.11@62.23,11.62 R79.1@62.23,14.29 ; S1.10@64.77,11.62 R80.1@64.77,14.29 ; SW2.3@65.74,53.775 v3(65.74,57.8) SW2.4@65.74,61.785 ; S1.9@67.31,11.62 R81.1@67.31,14.29 ; v1(77.05,19) C36S.2@77.05,20.15 ; SW3.3@78.44,53.775 v1(78.44,57.8) SW3.4@78.44,61.785 ; SW4.3@91.14,53.775 v3(91.14,57.8) SW4.4@91.14,61.785 ; C4S.2@93.45,50.45 v1(93.45,51.5) ; R83.1@95.25,108.265 97.885,108.265 98.55,107.6 98.55,105.435 J2S.3@98.55,105.2 ; C27.1@98.65,35.8 v1(99.65,36.8) ; U6.12@101.575,33.8 v1(102.85,33.8) ; SW5.3@103.84,53.775 v3(103.84,57.8) SW5.4@103.84,61.785 ; v1(111.15,34.8) 111.35,34.6 U6.34@112.725,34.6 113.65,34.6 113.85,34.8 114.935,34.8 C25.1@115.05,34.8 ; v3(114.95,22.6) 115.65,22.6 116.52,21.73 C30.1@116.52,20.955 ; C25.1@114.95,35.2 114.95,35.24 v1(114.95,36.6) ; C56S.2@115.35,15.6 115.45,15.6 v3(117.15,15.6) 117.95,15.6 118.11,15.76 U3.7@118.11,17.915 ; SW6.3@116.54,53.775 v3(116.54,57.8) SW6.4@116.54,61.785 ; C30.1@116.55,20.8 116.55,20.925 C30.1@116.52,20.955 ; C32.1@119.065,20.955 C30.1@116.52,20.955 ; U3.11@121.92,12.565 121.92,14.17 122.35,14.6 124.55,14.6 ; U3.13@124.46,12.565 124.46,14.09 124.55,14.6 ; v3(126.85,17.6) 126.9,17.65 C31.2@128.35,17.65 ; C29.1@127.95,14.6 v3(126.75,14.6) 124.55,14.6 ; v3(134.95,96.4) C65S.2@134.95,98.05 ; SW7.3@145.08,5.96 v3(149.09,5.96) SW7.4@152.95,5.96 SW7.4@153.09,5.96 ; R8S.1@147.75,63.4 147.75,63.1 R7S.1@149.55,61.3 ; v3(149.45,73.3) 149.7,73.05 R5S.1@149.7,71.8 ; R7S.1@149.7,60.8 149.7,59.25 v3(149.75,59.2) ; v1(151.85,55.6) 153.67,55.6 C75S.2@153.75,55.6 ; v3(152.95,65.4) 152.95,66.275 U1S.10@152.95,66.3 ; C75S.2@153.67,55.475 154.325,55.475 154.45,55.6 v1(155.65,55.6) ; C21S.2@156.15,62.3 C21S.2@156.15,61.95 156.15,61.1 v3(156.65,60.6) R6S.1@158.6,60.6 ; C68S.2@156.85,74 C68S.2@157,73.85 ; C68S.2@157,74.6 C68S.2@157,73.85 ; v3(157.75,73.1) C68S.2@157,73.85 ; C79S.1@159.55,20.9 159.55,23.4 160,23.85 C72S.2@160,25.676 ; v1(160.65,101.3) 160.95,101 C62S.2@160.95,99.95
  Top Layer w0.5: C59S.2@100.15,50.5 v3(100.15,52.2) ; C59S.2@101.35,51 v3(101.35,52.2) ; R31S.1@155.89,20.32 157.33,20.32 v3(157.35,20.3) ; D2S.1@162.875,12.53 162.875,11.575 v3(163.35,11.1)
  Top Layer w0.6: v3(1.35,26.2) 2.6,24.95 R8.2@2.75,24.95 ; v3(9.55,19.6) C3.2@9.55,21.7 ; v3(10.55,55.2) C5.2@12.65,55.2 ; v3(11.95,52.6) U1.4@14.35,52.6 ; U1.4@14.35,52.505 16.055,52.505 v3(16.35,52.8) ; v3(46.65,41.3) 48.45,41.3 v3(50.35,41.3) ; C54S.2@63.15,49.7 v3(63.15,51.6) ; C58S.2@67.15,49.7 v3(67.15,51.6) ; C57S.2@81.95,12.9 v1(81.95,14.2) ; C57S.2@83.15,13.1 v1(83.15,14.2) ; C60S.2@97.15,27.9 98.85,27.9 v1(98.85,28.1)
  Top Layer w0.9: v3(9.35,96) C18.2@9.35,97.8 ; v3(153.65,37) 153.67,36.98 C77S.2@153.67,35.155 ; C78S.2@153.67,25.805 155.455,25.805 v3(155.55,25.9) ; C76S.2@153.67,46.76 155.61,46.76 v3(155.65,46.8) ; R34S.1@155.89,41.275 155.89,40.06 156.15,39.8 157.75,39.8 157.955,40.005 GJ2S.1@159.385,40.005
  Top Layer w1: v3(14.15,64.6) 15.05,63.6 15.016,62.766 15.081,62.858 15.25,63.1 C74S.2@15.45,62.6 ; C73S.2@18.95,62 v3(21.15,62) ; v3(48.75,24.2) C19.2@48.75,25.9 C19.2@48.75,26 ; D1S.1@114.15,111.2 114.288,110.8 114.373,110.8 v4(116.55,110.8) ; D1S.1@114.288,111.76 114.283,111.781 114.15,112.4 114.288,112.8 114.373,112.8 v4(116.55,112.8)
  Bottom Layer w0.127: C5S.2@76.55,29.15 76.7,29.15 76.95,28.9 v1(77.55,28.9)
  Bottom Layer w0.2: C27S.2@72.15,36.15 73.1,36.15 73.85,36.9 v1(74.55,36.9) ; C15S.2@72.25,31.9 v1(73.55,31.9) ; v1(73.55,40.9) 74.45,40.9 74.55,41 C34S.2@74.55,41.15 ; C34S.2@74.55,40.9 v1(75.55,40.9) C45S.2@76.35,40.9 ; C45S.2@76.55,40.9 76.575,40.875 v1(77.55,39.9) ; C11S.2@78.55,32.85 79.5,32.85 v1(79.55,32.9) ; C49S.2@78.55,36.9 v1(79.55,36.9) ; C50S.2@78.65,26.9 v1(79.55,26.9) ; C32S.2@78.65,42.9 v1(79.55,42.9) ; C47S.2@80.55,30.85 80.55,30.9 81.25,31.6 81.25,32.2 v1(80.55,32.9) ; C12S.2@80.55,40.85 80.7,40.85 80.75,40.9 v1(81.55,40.9) ; v1(81.55,27.9) 82.3,27.15 C80S.2@82.55,27.15 ; v1(81.55,32.9) C30S.2@82.55,32.9 ; v1(81.55,36.9) C23S.2@82.55,36.9 ; C30S.2@82.55,32.85 C30S.2@82.55,32.9 ; v1(82.55,33.9) C30S.2@82.55,32.9 ; v1(82.55,35.9) C23S.2@82.55,36.9 ; C28S.2@82.55,42.85 v1(83.55,41.9) ; v1(83.55,32.9) C30S.2@82.55,32.9 ; v1(83.55,36.9) C23S.2@82.55,36.9 ; C43S.2@84.55,30.85 84.55,30.9 83.85,31.6 83.85,32.2 v1(84.55,32.9) ; v1(84.55,37.9) C44S.2@84.55,39.15 ; v1(85.55,26.9) C46S.2@86.55,26.9 ; v1(85.55,32.9) 86.5,32.8 C42S.2@86.55,32.85 ; v1(85.55,36.9) C41S.2@86.55,36.9 ; v1(85.55,42.9) 86.25,42.9 86.3,42.85 C19S.2@86.55,42.85 ; C37S.2@87.25,20.15 87.3,20.1 v1(88.25,20.1) ; v1(87.55,29.9) 88.25,29.2 C48S.2@88.55,29.2 ; v1(87.55,40.9) 88.25,40.9 88.35,40.8 C31S.2@88.55,40.8 ; v1(90.55,36.9) C33S.2@91.65,36.9 ; v1(91.55,31.9) C14S.2@92.65,31.9
  Bottom Layer w0.3: v1(93.55,23.9) 93.75,24.1 C9S.2@93.75,25.95
  Bottom Layer w0.4: v1(53.45,33.7) 54.61,33.7 C18S.2@54.75,33.7 ; C17S.2@61.05,34.7 v1(62.05,34.7) ; v1(102.85,33.8) 103.15,33.5 C20S.2@103.95,33.5 ; C6S.2@109.95,34.8 v1(111.15,34.8)
GREEN0: FPGA1S.D10 R103.1 | length 59.8
  Top Layer w0.2: R103.1@61.35,94.05 61.35,92.9 62.25,92 62.25,89.8 64.05,88 v1(64.05,84.3) ; v1(76.55,53.6) 78.85,51.3 78.85,48 80.55,46.3 80.55,42.9 FPGA1S.D10@81.05,42.4
  MidLayer1 w0.2: v1(64.05,84.3) 64.05,78.9 64.95,78 64.95,75.1 75.65,64.4 75.65,55.7 76.55,54.8 v1(76.55,53.6)
GREEN1: FPGA1S.C11 R105.1 | length 60.9
  Top Layer w0.2: R105.1@63.95,94.05 63.95,93.1 64.75,92.3 64.75,90 68.05,86.7 v1(68.05,83.2) ; v1(81.55,42.9) FPGA1S.C11@82.05,43.4
  MidLayer1 w0.2: v1(68.05,83.2) 68.047,82.398 67.501,81.849 67.501,74.749 76.45,65.8 76.45,56.1 77.55,55 77.55,51.6 80.75,48.4 80.75,47.4 82.55,45.6 82.55,43.1 82.35,42.9 v1(81.55,42.9)
GREEN2: FPGA1S.E11 R110.1 | length 61.4
  Top Layer w0.2: R110.1@66.55,94.05 66.55,93.5 67.25,92.8 67.25,90 70.75,86.5 v1(70.75,83.7) ; v1(81.55,41.9) FPGA1S.E11@82.05,41.4
  MidLayer1 w0.2: v1(70.75,83.7) 70.05,83 70.05,74.6 77.25,67.4 77.25,57 78.35,55.9 78.35,53.1 82.95,48.5 82.95,42.3 82.55,41.9 v1(81.55,41.9)
GREEN#: J5.2 R104.2 R105.2 R110.2 | length 16
  Top Layer w0.4: R104.2@58.75,95.95 58.75,97.2 59.15,97.6 63.95,97.6 ; R105.2@63.95,95.95 63.95,97.6 ; J5.2@64.774,100.965 64.774,99.024 63.95,98.2 63.95,97.6 ; R110.2@66.55,95.95 66.55,97.2 66.15,97.6 63.95,97.6
HARD_TCK: R11S.1 U1S.7 | length 3.9
  Top Layer w0.4: R11S.1@149.7,66.6 149.7,66.65 151.275,68.225 U1S.7@152.875,68.225
HARD_TDI: R9S.1 U1S.5 | length 3.3
  Top Layer w0.4: R9S.1@149.7,69.2 150.85,69.2 151.175,69.525 U1S.5@152.875,69.525
HARD_TDO: R10S.1 U1S.17 | length 20.8
  Top Layer w0.4: R10S.1@158.6,58 154.55,58 153.45,59.1 153.45,61 155.25,62.8 155.25,68.8 156.625,70.175 U1S.17@159.425,70.175
HARD_TMS: R12S.1 U1S.9 | length 5.9
  Top Layer w0.4: U1S.9@152.875,66.925 154.325,66.925 154.55,66.7 154.55,63.7 154.25,63.4 R12S.1@153.5,63.4
HSYNC: FPGA1S.A8 R94.1 | length 70.1
  Top Layer w0.2: R94.1@48.35,99.05 53.2,99.05 v1(53.25,99.1) ; v1(77.85,48.7) 77.85,47.7 78.35,47.2 78.35,46.1 FPGA1S.A8@79.05,45.4
  Top Layer w0.4: R94.1@48.2,99.05 R94.1@48.35,99.05
  MidLayer1 w0.2: v1@53.25,99 v1(53.25,99.1) 57.15,95.2 57.15,85.4 58.25,84.3 58.25,82.3 59.875,80.675 59.875,74.675 74.05,60.5 74.05,53.9 75.05,52.9 75.05,50.8 75.75,50.1 76.65,50.1 77.85,48.9 v1(77.85,48.7)
IO0: FPGA1S.V7 HDR1.2 | length 24.1
  Top Layer w0.2: FPGA1S.V7@78.05,28.4 77.55,27.9 77.55,23.9 77.85,23.6 77.85,10.5 81.915,6.435 HDR1.2@81.915,6.35
IO1: FPGA1S.AA8 HDR1.3 | length 25.3
  Top Layer w0.2: FPGA1S.AA8@79.05,25.4 78.55,24.9 78.55,24.166 78.25,23.866 78.25,10.7 80.15,8.8 81.45,8.8 83.15,7.1 83.15,5.115 HDR1.3@84.455,3.81
IO2: FPGA1S.AB8 HDR1.4 | length 22
  Top Layer w0.2: FPGA1S.AB8@79.05,24.4 79.05,24.1 78.65,23.7 78.65,10.9 80.35,9.2 82.655,9.2 84.455,7.4 HDR1.4@84.455,6.35
IO3: FPGA1S.V8 HDR1.5 | length 29.5
  Top Layer w0.2: FPGA1S.V8@79.05,28.4 v1(79.55,27.9)
  MidLayer1 w0.2: v1(79.55,27.9) 78.95,27.3 78.95,26.5 79.25,26.2 79.25,11.2 83.15,7.3 83.15,5.7 83.75,5.1 85.705,5.1 HDR1.5@86.995,3.81
IO4: FPGA1S.Y10 HDR1.6 | length 26.5
  Top Layer w0.2: FPGA1S.Y10@81.05,26.4 80.55,25.9 79.75,25.9 79.55,25.7 79.55,24 79.05,23.5 79.05,11.2 80.65,9.6 83.35,9.6 85.523,7.427 85.918,7.427 HDR1.6@86.995,6.35
IO5: FPGA1S.V9 HDR1.7 | length 30.4
  Top Layer w0.2: FPGA1S.V9@80.05,28.4 v1(80.55,27.9)
  MidLayer1 w0.127: 80.05,26.4 80.05,27.4
  MidLayer1 w0.2: 79.75,25.7 79.75,25.8 ; 80.05,26.4 79.75,26.1 79.75,25.8 ; 80.05,27.4 v1(80.55,27.9) ; HDR1.7@89.535,3.81 88.245,5.1 86.35,5.1 85.75,5.7 85.75,7.1 79.75,13.1 79.75,25.8
IO6: FPGA1S.W9 HDR1.8 | length 26.4
  Top Layer w0.2: FPGA1S.W9@80.05,27.4 v1(80.55,26.9)
  MidLayer1 w0.2: v1(80.55,26.9) 80.55,25.3 81.25,24.6 81.25,12.2 84.446,9.004 85.75,7.7 88.185,7.7 HDR1.8@89.535,6.35
IO7: FPGA1S.AA10 HDR1.9 | length 31.1
  Top Layer w0.2: FPGA1S.AA10@81.05,25.4 80.55,24.9 80.55,24.1 79.45,23 79.45,11.6 80.85,10.2 81.05,10 83.55,10 85.695,7.855 87.395,7.855 88.25,7 88.25,5.8 89.05,5 90.85,5 HDR1.9@92.04,3.81 ; HDR1.9@92.04,3.81 HDR1.9@92.075,3.81 HDR1.9@92.04,3.81
IO8: FPGA1S.AB10 HDR1.10 | length 27.7
  Top Layer w0.2: FPGA1S.AB10@81.05,24.4 81.05,23.7 81.35,23.4 81.35,18.7 79.95,17.3 79.95,11.8 81.35,10.4 83.75,10.4 85.85,8.3 89.15,8.3 89.85,7.6 90.825,7.6 HDR1.10@92.075,6.35
IO9: FPGA1S.W10 HDR1.11 | length 35.1
  Top Layer w0.2: FPGA1S.W10@81.05,27.4 81.55,26.9 81.55,23.8 81.75,23.6 81.75,18.4 80.45,17.1 80.45,12 81.65,10.8 83.95,10.8 86.05,8.7 89.35,8.7 90.05,8 92.75,8 93.35,7.4 93.35,5.075 HDR1.11@94.615,3.81
IO10: FPGA1S.AB11 HDR1.12 | length 27.4
  Top Layer w0.2: FPGA1S.AB11@82.05,24.4 82.05,23.9 82.25,23.7 82.25,19.2 84.05,17.4 84.05,11.3 86.25,9.1 89.55,9.1 90.25,8.4 93.95,8.4 94.615,7.735 HDR1.12@94.615,6.35
IO11: FPGA1S.U11 HDR1.13 | length 36.2
  Top Layer w0.2: FPGA1S.U11@82.05,29.4 82.55,28.9 82.55,24.1 82.65,24 82.65,19.4 84.45,17.6 84.45,11.5 86.45,9.5 89.75,9.5 90.45,8.8 94.55,8.8 95.85,7.5 95.85,5.115 HDR1.13@97.155,3.81
IO12: FPGA1S.AB13 HDR1.14 | length 27.6
  Top Layer w0.2: FPGA1S.AB13@84.05,24.4 84.05,19.2 85.65,17.6 85.65,12.1 87.85,9.9 89.95,9.9 90.65,9.2 95.65,9.2 97.155,7.695 HDR1.14@97.155,6.35
IO13: FPGA1S.AA13 HDR1.15 | length 32.8
  Top Layer w0.2: FPGA1S.AA13@84.05,25.4 84.55,24.9 84.55,19.4 86.05,17.9 86.05,12.3 88.05,10.3 90.25,10.3 90.95,9.6 96.75,9.6 98.45,7.9 98.45,5.055 HDR1.15@99.695,3.81
IO14: FPGA1S.V10 HDR1.16 | length 37.8
  Top Layer w0.2: FPGA1S.V10@81.05,28.4 v1(81.55,28.9)
  MidLayer1 w0.2: v1(81.55,28.9) 82.15,28.3 82.15,18.2 82.55,17.8 82.55,11.5 85.95,8.1 97.95,8.1 99.695,6.355 HDR1.16@99.695,6.35
IO15: FPGA1S.U10 HDR1.17 | length 43.4
  Top Layer w0.2: FPGA1S.U10@81.05,29.4 v1(81.55,29.9)
  MidLayer1 w0.2: v1(81.55,29.9) 82.55,28.9 82.55,18.6 83.75,17.4 83.75,10.9 86.05,8.6 99.85,8.6 100.95,7.5 100.95,5.095 HDR1.17@102.235,3.81
IO16: FPGA1S.W13 HDR1.18 | length 38.3
  Top Layer w0.2: v1(83.55,26.9) FPGA1S.W13@84.05,27.4
  MidLayer1 w0.2: v1(83.55,26.9) 82.95,26.3 82.95,18.8 84.15,17.6 84.15,11.1 86.25,9 101.35,9 102.235,8.115 HDR1.18@102.235,6.35
IO17: FPGA1S.Y13 HDR1.19 | length 41
  Top Layer w0.2: v1(83.55,25.9) FPGA1S.Y13@84.05,26.4
  MidLayer1 w0.2: v1(83.55,25.9) 83.55,18.8 84.65,17.7 84.65,12.3 84.55,12.2 84.55,11.3 86.35,9.5 102.25,9.5 103.45,8.3 103.45,5.135 HDR1.19@104.775,3.81
IO18: FPGA1S.V14 HDR2.2 | length 50.8
  Top Layer w0.2: v1(84.55,27.9) FPGA1S.V14@85.05,28.4
  MidLayer1 w0.2: v1(84.55,27.9) 84.55,19 85.45,18.1 85.45,12.9 88.05,10.3 107.35,10.3 110.15,7.5 116.29,7.5 HDR2.2@117.44,6.35
IO19: FPGA1S.V13 HDR2.3 | length 55.1
  Top Layer w0.2: v1(83.55,27.9) FPGA1S.V13@84.05,28.4
  MidLayer1 w0.2: v1(83.55,27.9) 84.15,27.3 84.15,18.8 85.05,17.9 85.05,12.7 87.85,9.9 104.25,9.9 109.05,5.1 118.69,5.1 HDR2.3@119.98,3.81
IO20: FPGA1S.AA15 HDR2.4 | length 50.6
  Top Layer w0.2: FPGA1S.AA15@86.05,25.4 85.55,24.9 85.55,23.8 86.45,22.9 86.45,12.5 88.25,10.7 90.65,10.7 91.35,10 104.15,10 109.05,5.1 118.73,5.1 HDR2.4@119.98,6.35
IO21: FPGA1S.W14 HDR2.5 | length 57.9
  Top Layer w0.2: FPGA1S.W14@85.05,27.4 v1(85.55,27.9)
  MidLayer1 w0.2: v1(85.55,27.9) 84.95,27.3 84.95,19.2 85.85,18.3 85.85,13.1 88.25,10.7 107.55,10.7 110.35,7.9 120.55,7.9 121.25,7.2 121.25,5.08 HDR2.5@122.52,3.81
IO22: FPGA1S.AB15 HDR2.6 | length 50.3
  Top Layer w0.2: FPGA1S.AB15@86.05,24.4 86.05,23.9 86.85,23.1 86.85,12.7 87.076,12.474 88.45,11.1 90.85,11.1 91.55,10.4 106.35,10.4 109.25,7.5 121.37,7.5 HDR2.6@122.52,6.35
IO23: FPGA1S.Y16 HDR2.7 | length 57
  Top Layer w0.2: FPGA1S.Y16@87.05,26.4 86.55,25.9 86.55,24 87.25,23.3 87.25,12.9 88.65,11.5 91.05,11.5 91.75,10.8 106.55,10.8 109.45,7.9 123.35,7.9 123.75,7.5 123.75,5.12 HDR2.7@125.06,3.81
IO24: FPGA1S.AA17 HDR2.8 | length 52.6
  Top Layer w0.2: FPGA1S.AA17@88.05,25.4 87.55,24.9 87.55,23.7 87.65,23.6 87.65,14.8 88.05,14.4 92.25,14.4 95.45,11.2 106.75,11.2 109.65,8.3 124.55,8.3 125.06,7.79 HDR2.8@125.06,6.35
IO25: FPGA1S.AA18 HDR2.9 | length 53.6
  Top Layer w0.2: FPGA1S.AA18@89.05,25.4 88.55,24.9 88.55,23.7 88.85,23.4 88.85,18.4 95.65,11.6 106.95,11.6 109.85,8.7 125.25,8.7 126.35,7.6 126.35,5.06 HDR2.9@127.6,3.81
IO26: FPGA1S.AB18 HDR2.10 | length 50.1
  Top Layer w0.2: FPGA1S.AB18@89.05,24.4 89.05,23.8 89.25,23.6 89.25,18.6 95.85,12 107.15,12 110.05,9.1 126.15,9.1 127.6,7.65 HDR2.10@127.6,6.35
IO27: FPGA1S.Y18 HDR2.11 | length 56.5
  Top Layer w0.2: FPGA1S.Y18@89.05,26.4 89.55,25.9 89.55,24 89.65,23.9 89.65,18.8 96.05,12.4 107.35,12.4 110.25,9.5 127.75,9.5 128.85,8.4 128.85,5.1 HDR2.11@130.14,3.81
IO28: FPGA1S.Y19 HDR2.12 | length 54.6
  Top Layer w0.2: FPGA1S.Y19@90.05,26.4 90.55,25.9 90.55,24 90.05,23.5 90.05,19 96.25,12.8 107.55,12.8 110.45,9.9 129.05,9.9 130.14,8.81 HDR2.12@130.14,6.35
IO29: FPGA1S.AB20 HDR2.13 | length 56.3
  Top Layer w0.2: FPGA1S.AB20@91.05,24.4 91.05,23.5 90.45,22.9 90.45,19.2 96.45,13.2 107.75,13.2 110.65,10.3 130.05,10.3 131.45,8.9 131.45,5.04 HDR2.13@132.68,3.81
IO30: FPGA1S.AA20 HDR2.14 | length 54.3
  Top Layer w0.2: FPGA1S.AA20@91.05,25.4 91.55,24.9 91.55,23.8 92.15,23.2 92.15,18.1 96.65,13.6 107.95,13.6 110.85,10.7 130.35,10.7 132.68,8.37 HDR2.14@132.68,6.35
IO31: FPGA1S.U16 HDR2.15 | length 71.4
  Top Layer w0.2: v1(86.55,29.9) FPGA1S.U16@87.05,29.4
  MidLayer1 w0.2: v1(86.55,29.9) 86.15,29.5 86.15,19.6 86.45,19.3 86.45,13.1 88.45,11.1 107.75,11.1 110.55,8.3 122.85,8.3 123.75,7.4 123.75,5.7 124.35,5.1 133.93,5.1 HDR2.15@135.22,3.81
IO32: FPGA1S.V16 HDR2.16 | length 68.1
  Top Layer w0.2: FPGA1S.V16@87.05,28.4 v1(87.55,28.9)
  MidLayer1 w0.2: v1(87.55,28.9) 86.55,27.9 86.55,19.9 86.85,19.6 86.85,13.3 88.65,11.5 107.95,11.5 110.75,8.7 123.95,8.7 124.95,7.7 133.87,7.7 HDR2.16@135.22,6.35
IO33: FPGA1S.V17 HDR2.17 | length 70.8
  Top Layer w0.2: v1(87.55,27.9) FPGA1S.V17@88.05,28.4
  MidLayer1 w0.2: v1(87.55,27.9) 86.95,27.3 86.95,20.1 87.25,19.8 87.25,14.3 87.55,14 89.75,14 91.85,11.9 108.15,11.9 110.95,9.1 124.15,9.1 125.15,8.1 135.55,8.1 136.45,7.2 136.45,5.12 HDR2.17@137.76,3.81
IO34: FPGA1S.W16 HDR2.18 | length 67.3
  Top Layer w0.2: FPGA1S.W16@87.05,27.4 v1(87.55,26.9)
  MidLayer1 w0.2: v1(87.55,26.9) 87.35,26.7 87.35,20.4 87.65,20.1 87.65,14.9 88.15,14.4 89.95,14.4 92.05,12.3 108.35,12.3 111.15,9.5 124.35,9.5 125.25,8.6 136.75,8.6 137.76,7.59 HDR2.18@137.76,6.35
IO35: FPGA1S.W17 HDR2.19 | length 70.6
  Top Layer w0.2: FPGA1S.W17@88.05,27.4 v1(88.55,26.9)
  MidLayer1 w0.2: v1(88.55,26.9) 87.75,26.1 87.75,24.5 88.85,23.4 88.85,18.8 90.35,17.3 90.35,14.6 92.25,12.7 108.55,12.7 111.35,9.9 124.55,9.9 125.45,9 138.15,9 138.95,8.2 138.95,5.16 HDR2.19@140.3,3.81
KBCLOCK: FPGA1S.F20 R89.1 | length 84.7
  Top Layer w0.2: FPGA1S.F20@91.05,40.4 v1(91.55,39.9) ; R89.1@119.35,98.05 119.35,96.6 121.55,94.4 121.55,80.7 120.75,79.9 120.75,64.3 v1(122.25,62.8)
  MidLayer1 w0.2: v1(91.55,39.9) 92.45,39.9 93.35,39 99.65,39 102.15,41.5 111.05,41.5 118.65,49.1 118.65,56.1 122.25,59.7 v1(122.25,62.8)
KBDATA: FPGA1S.G19 R88.1 | length 85.9
  Top Layer w0.2: FPGA1S.G19@90.05,39.4 v1(90.55,39.9) ; R88.1@121.95,98.05 121.95,80.3 121.15,79.5 121.15,65.4 v1(122.95,63.6)
  MidLayer1 w0.2: v1(90.55,39.9) 91.25,39.2 92.25,39.2 92.85,38.6 99.85,38.6 102.25,41 111.15,41 119.05,48.9 119.05,55.9 122.95,59.8 v1(122.95,63.6)
LED0: FPGA1S.W2 LD0.1 | length 27.8
  Top Layer w0.2: LD0.1@49.53,20.635 49.53,23.08 50.95,24.5 68.95,24.5 71.35,26.9 72.55,26.9 FPGA1S.W2@73.05,27.4
LED1: FPGA1S.Y1 LD1.1 | length 23.9
  Top Layer w0.2: LD1.1@52.07,20.635 52.07,23.22 52.95,24.1 69.15,24.1 71.45,26.4 FPGA1S.Y1@72.05,26.4
LED2: FPGA1S.Y2 LD2.1 | length 22.3
  Top Layer w0.2: LD2.1@54.61,20.635 54.61,23.16 55.15,23.7 69.35,23.7 71.55,25.9 72.55,25.9 FPGA1S.Y2@73.05,26.4
LED3: FPGA1S.Y3 LD3.1 | length 21.1
  Top Layer w0.2: LD3.1@57.15,20.635 57.15,22.6 57.85,23.3 68.15,23.3 68.35,23.1 v1(69.65,23.1) ; v1(73.55,25.9) FPGA1S.Y3@74.05,26.4
  MidLayer1 w0.2: v1(69.65,23.1) 69.65,23.9 71.65,25.9 v1(73.55,25.9)
LED4: FPGA1S.W4 LD4.1 | length 20.5
  Top Layer w0.2: LD4.1@59.69,20.635 59.69,22.24 60.35,22.9 67.95,22.9 68.35,22.5 v1(68.95,22.5) ; v1(74.55,26.9) FPGA1S.W4@75.05,27.4
  MidLayer1 w0.2: v1(68.95,22.5) 72.05,22.5 74.55,25 v1(74.55,26.9)
LED5: FPGA1S.W5 LD5.1 | length 19
  Top Layer w0.2: LD5.1@62.23,20.635 62.23,20.8 62.25,20.82 v1(62.25,22.3) ; v1(75.55,26.9) FPGA1S.W5@76.05,27.4
  MidLayer1 w0.2: v1(62.25,22.3) 63.25,22.3 63.55,22.6 67.15,22.6 67.85,21.9 72.05,21.9 74.95,24.8 74.95,26.3 v1(75.55,26.9)
LED6: FPGA1S.Y5 LD6.1 | length 15.2
  Top Layer w0.2: LD6.1@64.75,21 v1(64.75,21.9) ; v1(75.55,25.9) FPGA1S.Y5@76.05,26.4
  MidLayer1 w0.2: v1(64.75,21.9) 65.35,21.3 72.05,21.3 75.55,24.8 v1(75.55,25.9)
LED7: FPGA1S.W6 LD7.1 | length 13.9
  Top Layer w0.2: LD7.1@67.31,20.895 68.255,20.895 68.55,20.6 v1(71.85,20.6) ; v1(76.55,26.9) FPGA1S.W6@77.05,27.4
  MidLayer1 w0.127: 76.05,25.4 76.05,26.4
  MidLayer1 w0.2: v1(71.85,20.6) 72.35,20.6 76.05,24.3 76.05,25.4 ; 76.05,26.4 v1(76.55,26.9)
LED_DONE: FPGA1S.AB21 R24.1 | length 51.5
  Top Layer w0.2: FPGA1S.AB21@92.05,24.4 92.05,23.9 92.55,23.4 92.55,18.3 96.85,14 108.15,14 111.05,11.1 133.25,11.1 133.55,11.4 R24.1@133.55,12.45
MOUSECLOCK: FPGA1S.L17 R93.1 | length 124.3
  Top Layer w0.2: FPGA1S.L17@88.05,35.4 v1(88.55,35.9)
  Top Layer w0.4: R93.1@158.35,99.95 158.35,100.6 v3(159.05,101.3)
  MidLayer1 w0.2: v1(88.55,35.9) 88.55,36.9 89.45,37.8 ; 89.25,37.6 89.45,37.8 ; v1(124.15,65) 124.15,59.8 119.85,55.5 119.85,48.5 111.35,40 102.45,40 100.25,37.8 89.45,37.8
  Bottom Layer w0.4: 123.05,80.5 123.05,79.7 121.65,78.3 121.65,67.5 v1(124.15,65) ; 123.05,80.6 123.05,81.5 127.75,86.2 127.75,93.2 129.45,94.9 137.05,94.9 138.95,96.8 154.55,96.8 v3(159.05,101.3)
MOUSEDATA: FPGA1S.G18 R92.1 | length 72.8
  Top Layer w0.2: FPGA1S.G18@89.05,39.4 v1(89.55,38.9)
  Top Layer w0.3: v1(123.55,64.3) 121.65,66.2 121.65,79.2 123.825,81.375 R92.1@123.825,82.87
  MidLayer1 w0.2: v1(89.55,38.9) 90.25,38.2 100.05,38.2 102.35,40.5 111.25,40.5 119.45,48.7 119.45,55.7 123.55,59.8 v1(123.55,64.3)
NetC1_1: C1.1 C8.2 RN1.7 U2.1 | length 35.6
  Top Layer w0.4: C1.1@2.55,16.6 C1.1@2.55,16.7 2.55,17.8 3.15,18.4 v3(6.95,18.4) v3(11.35,18.4) 12.35,18.4 12.645,18.695 U2.1@12.645,20 ; RN1.7@10.795,36.195 10.795,37.545 11,37.75 C8.2@11,39.4
  Bottom Layer w0.4: v3(6.95,18.4) 6.95,30.6 10.795,34.445 RN1.7@10.795,36.195
NetC1_2: C1.2 R2.1 R4.1 | length 6.7
  Top Layer w0.4: R4.1@3.5,10.8 3.5,11.65 2.55,12.6 C1.2@2.55,13.7 5.5,13.7 R2.1@5.8,13.4
NetC2_1: C2.1 C10.2 RN2.7 U2.7 | length 20
  Top Layer w0.4: C10.2@11.2,32.4 11.2,30.25 10.795,29.845 RN2.7@10.795,28.575 11.97,27.4 13.15,27.4 13.915,26.635 U2.7@13.915,25.2 ; v3(17.95,25.4) C2.1@20.15,25.4
  Bottom Layer w0.4: RN2.7@10.795,28.575 13.97,25.4 v3(17.95,25.4)
NetC2_2: C2.2 R3.1 R5.1 | length 8.1
  Top Layer w0.4: C2.2@20.55,22 20.6,22.05 R5.1@23.35,22.05 25.1,22.05 25.35,21.8 25.35,20 25.15,19.8 R3.1@24.1,19.8
NetC5_1: C5.1 C34.2 U1.3 | length 7.9
  Top Layer w0.4: U1.3@14.35,51.235 17.165,51.235 C34.2@17.2,51.2 17.2,54.35 16.35,55.2 C5.1@15.65,55.2
NetC6_2: C6.2 C40.2 RN1.1 | length 18.9
  Top Layer w0.4: RN1.1@26.035,36.195 34.555,36.195 36.46,34.29 C40.2@38.767,34.29 38.767,32.017 37.97,31.22 C6.2@37.97,29.21
NetC7_2: C7.2 C41.2 RN2.1 | length 18.7
  Top Layer w0.4: RN2.1@26.035,28.575 31.575,28.575 34.75,25.4 C7.2@37.97,25.4 37.97,22.58 38.767,21.783 C41.2@38.767,20.32
NetC8_1: C8.1 RN1.6 U2.2 | length 22.8
  Top Layer w0.4: C8.1@12.9,39.4 12.9,37.85 13.335,37.415 RN1.6@13.335,36.195 ; U2.2@13.95,20.2 v3(13.95,22.2)
  Bottom Layer w0.4: RN1.6@13.335,36.195 13.335,34.585 9.55,30.8 9.55,26.6 v3(13.95,22.2)
NetC9_2: C9.2 C14.2 RN1.4 RN1.5 RN1.10 | length 27.5
  Top Layer w0.4: C9.2@3.175,33.335 4.35,33.335 ; RN1.10@3.175,36.195 4.35,36.2 ; C14.2@5.715,33.335 4.35,33.335 ; RN1.5@15.875,36.195 RN1.4@18.415,36.195 ; 17.15,36.2 17.15,38.6 14.95,40.8 8.35,40.8 4.35,36.8 4.35,36.2 ; 4.35,33.335 4.35,36.2
NetC10_1: C10.1 RN2.6 U2.6 | length 8.1
  Top Layer w0.4: C10.1@13.1,32.4 13.1,30.05 13.335,29.815 RN2.6@13.335,28.575 13.375,28.575 15.185,26.765 U2.6@15.185,25.2
NetC11_2: C11.2 C15.2 RN2.4 RN2.5 RN2.10 | length 22.5
  Top Layer w0.4: RN2.10@3.175,28.575 3.175,28.625 4.55,30 6.9,30 C11.2@8.35,31.45 9,31.45 9.75,32.2 9.75,33.6 10.35,34.2 13.35,34.2 14.35,33.2 14.35,32.65 C15.2@15.55,31.45 ; C15.2@15.95,31.45 15.875,31.375 RN2.5@15.875,28.575 RN2.4@18.415,28.575
NetC12_1: C12.1 C16.2 | length 2.6
  Top Layer w0.4: C12.1@23.75,31.45 C16.2@26.35,31.45
NetC12_2: C12.2 RN1.2 RN1.3 | length 6.4
  Top Layer w0.4: RN1.3@20.955,36.195 22.15,36.195 ; RN1.2@23.495,36.195 22.15,36.195 ; C12.2@23.75,33.35 23.75,34.4 23.35,34.8 22.75,34.8 22.15,35.4 22.15,36.195
NetC13_1: C13.1 C17.2 | length 3.2
  Top Layer w0.4: C17.2@18.55,31.45 19,31.45 C13.1@20.95,33.4
NetC13_2: C13.2 RN2.2 RN2.3 | length 5.5
  Top Layer w0.4: C13.2@21.15,31.45 21.15,30 20.955,29.805 RN2.3@20.955,28.575 RN2.2@23.495,28.575
NetC20_1: C20.1 U4.1 | length 5.3
  Top Layer w0.3: C20.1@14.75,94.95 14.75,95.8 14.95,96 16.75,96 17.275,95.475 U4.1@17.275,93.825
NetC20_2: C20.2 U4.3 | length 6.4
  Top Layer w0.3: C20.2@14.75,93.05 14.75,92.2 15.15,91.8 17.75,91.8 18.575,92.625 U4.3@18.575,93.825
NetC21_2: C21.2 U4.2 | length 5.4
  Top Layer w0.3: C21.2@14.75,96.65 16.9,96.65 17.925,95.625 U4.2@17.925,93.825